# Altium PCB V2.0.pcbdoc
Units mil, origin at the board's own origin, x right, y up, seen from the top; angles counter-clockwise.
Board outline 3149.6 x 1850.4 mil, 2 copper layers (Top Layer, Bottom Layer), stack 62.2 mil thick; 47 components, 71 nets, 213 pads, 302 vias.
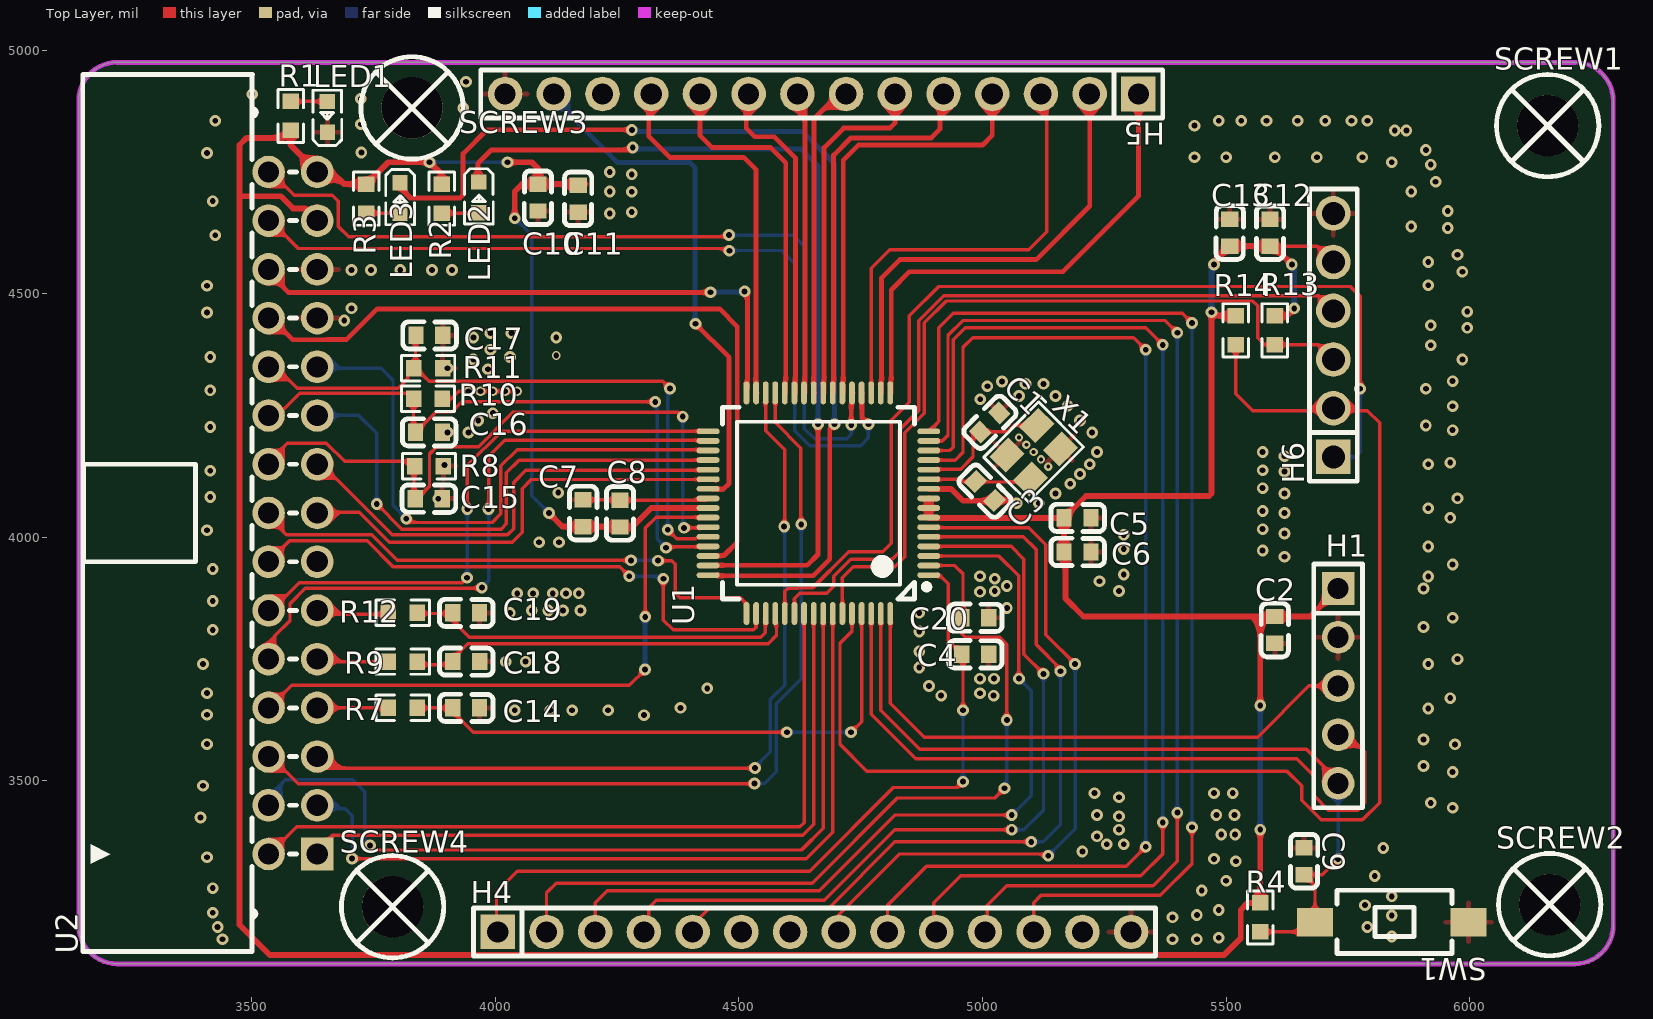
[diagram p0: Top Layer view]
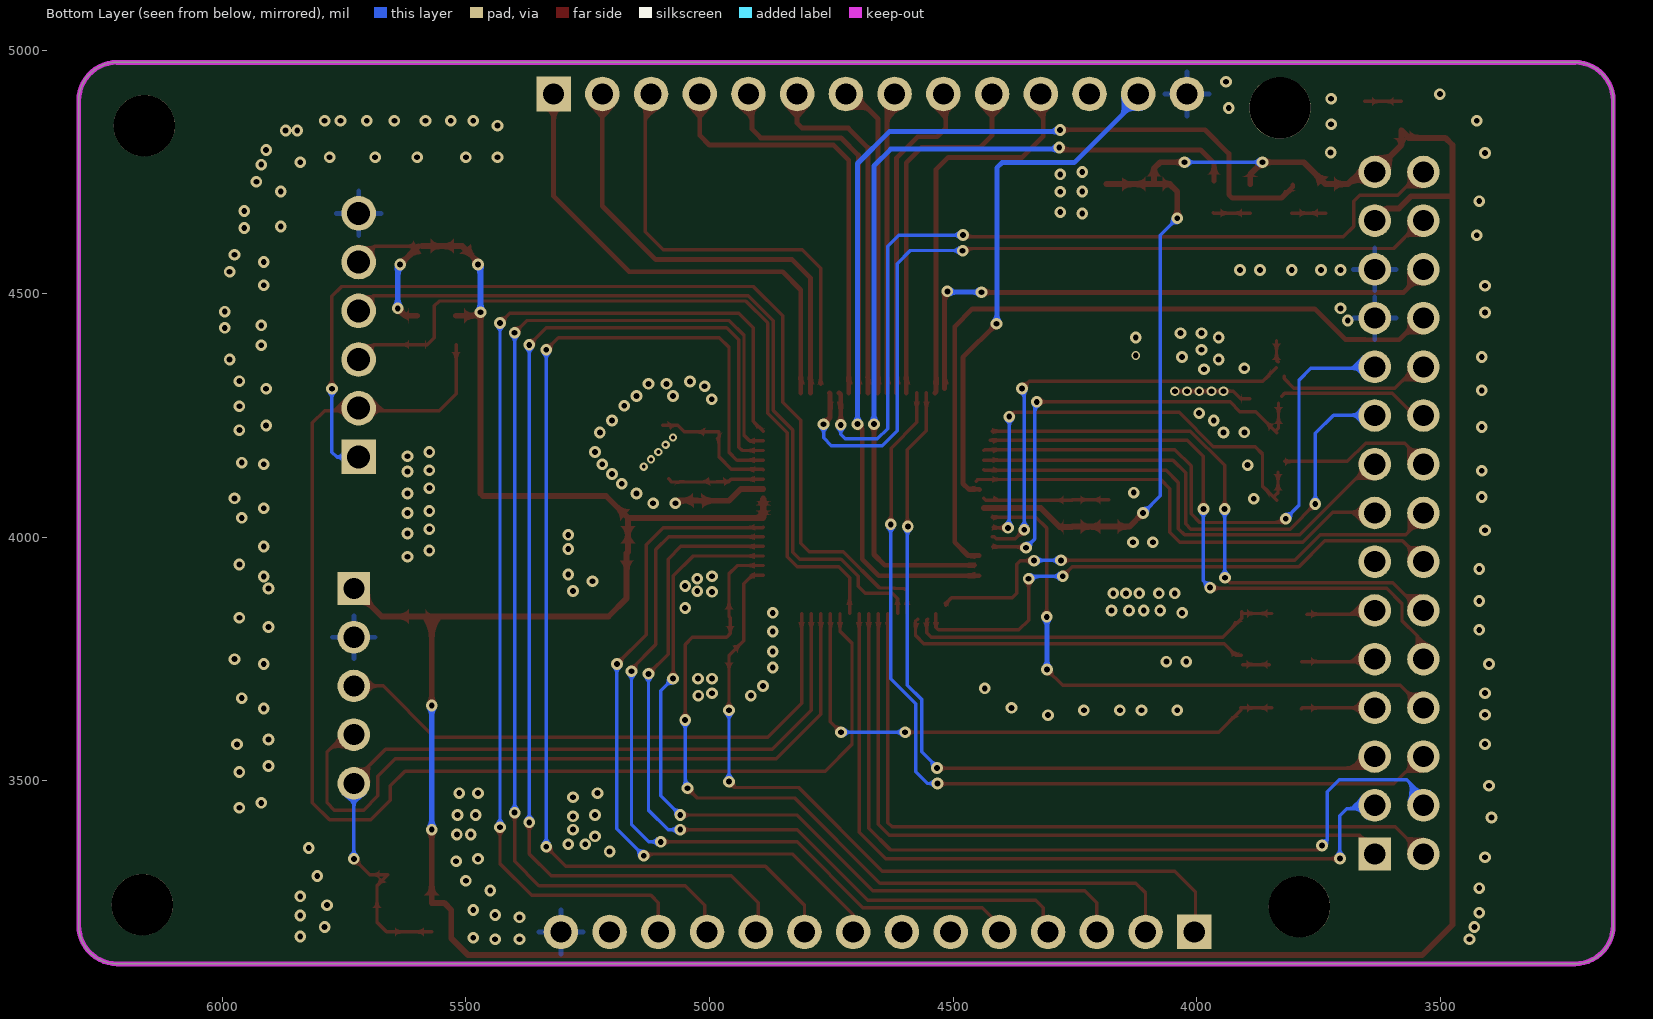
[diagram p1: Bottom Layer view, seen from below]

## Layer stack, top to bottom
Top Solder Mask Layer: solder mask 0.4, Dk 3.3
Top Layer: signal copper 1.4
Dielectric1: surface 59.4, FR4, Dk 4.5
Bottom Layer: signal copper 1.4
Bottom Solder Mask Layer: solder mask 0.4, Dk 3.3

## Board outline
3223.7,4975 ccw(c3223.7,4896.3) 3145,4896.3 3145,3203.3 ccw(c3223.7,3203.3) 3223.7,3124.6 6215.9,3124.6 ccw(c6215.9,3203.3) 6294.6,3203.3 6294.6,4896.3 ccw(c6215.9,4896.3) 6215.9,4975 3223.7,4975

## Design rules (kind name [scope] priority, off if disabled: settings)
BoardOutlineClearance copperThickness1oz [All] p0: genericclearance=10 ignorepadtopadclearanceinfootprint=FALSE except(0: Arc-SplitContinuation Track-SplitContinuation SMDPad-SplitContinuation THPad-SplitContinuation Via-SplitContinuation Fill-SplitContinuation Poly-SplitContinuation Region-SplitContinuation Text-SplitContinuation)
BoardOutlineClearance copperThickness2oz [All] p0: genericclearance=10 ignorepadtopadclearanceinfootprint=FALSE except(0: Arc-SplitContinuation Track-SplitContinuation SMDPad-SplitContinuation THPad-SplitContinuation Via-SplitContinuation Fill-SplitContinuation Poly-SplitContinuation Region-SplitContinuation Text-SplitContinuation)
BoardOutlineClearance otherClearance [All] p0: genericclearance=10 ignorepadtopadclearanceinfootprint=FALSE except(0: Arc-SplitContinuation Track-SplitContinuation SMDPad-SplitContinuation THPad-SplitContinuation Via-SplitContinuation Fill-SplitContinuation Poly-SplitContinuation Region-SplitContinuation Text-SplitContinuation)
Clearance copperThickness1oz [All] p1: gap=7 ignorepadtopadclearanceinfootprint=FALSE
Clearance copperThickness2oz [All] p1: gap=7 ignorepadtopadclearanceinfootprint=FALSE
Clearance otherClearance [All] p1: gap=7 ignorepadtopadclearanceinfootprint=FALSE
DiffPairsRouting differentialPair [All] p1: maxuncoupledlength=10 minlimit=6 maxlimit=Infinity mostfreqgap=6 toplayer_minwidth=5 toplayer_prefwidth=10 toplayer_maxwidth=100 bottomlayer_minwidth=5 bottomlayer_prefwidth=10 bottomlayer_maxwidth=100
PasteMaskExpansion pasteMaskExpansion [All] p1: expansion=0
PlaneConnect innerPlane [All] p1: planeconnectstyle=Relief reliefexpansion=20 reliefentries=4 reliefconductorwidth=10 reliefairgap=10
PolygonConnect copperRegion [All] p1: connectstyle=Relief reliefentries=4 reliefconductorwidth=10 polygonreliefangle="90 Angle" airgapwidth=10
RoutingVias viaSize [All] p1: viastyle="Through Hole" holewidth=12 minholewidth=6 maxholewidth=248.0314 width=12 minwidth=6 maxwidth=248.0314
SolderMaskExpansion solderMaskExpansion [IsVia] p1: useseparateexpansions=TRUE expansion=-1000 expansionbottom=-1000
SolderMaskExpansion solderMaskExpansion [All] p2: useseparateexpansions=TRUE expansion=2 expansionbottom=2
Width copperThickness1oz [All] p1: maxlimit=100 minlimit=5 preferedwidth=7
Width copperThickness2oz [All] p1: maxlimit=100 minlimit=8 preferedwidth=10

## Components (designator, comment, footprint, x,y, rotation, side; value= is the part's Value field where it differs from the comment)
C1 "100nF" C0603#1 5015,4236 r225 top
C2 "100nF" C0603#1 5600,3810 r90 top
C3 "100nF" C0603#1 5005,4095 r135 top
C4 "100nF" C0603#1 4985,3760 r180 top
C5 "100nF" C0603#1 5195,4040 r180 top
C6 "100nF" C0603#1 5195,3970 r180 top
C7 "100nF" C0603#1 4180.2,4049.5 r270 top
C8 "100nF" C0603#2 4255.8,4048.6 r270 top
C9 "100nF" C0603#1 5660,3335 r270 top
C10 "100nF" C0603#3 4087.6,4697.4 r90 top
C11 "100nF" C0603#1 4170,4695 r90 top
C12 "100nF" C0603#1 5590,4625 r270 top
C13 "100nF" C0603#2 5507.4,4625.2 r270 top
C14 "100nF" C0603#1 3940,3650 r180 top
C15 "100nF" C0603#3 3863.4,4079.4 r180 top
C16 "100nF" C0603#1 3863.9,4215.6 r180 top
C17 "100nF" C0603#2 3864.8,4414.6 r180 top
C18 "100nF" C0603#2 3940.1,3745 r180 top
C19 "100nF" C0603#1 3940,3845 r180 top
C20 "100nF" C0603#1 4985,3835 r180 top
H1 "" HDR-TH_5P-P2.54-V-M 5730,3695 r270 top
H4 "" HDR-TH_14P-P2.54-V-M 4655,3190 r0 top
H5 "" HDR-TH_14P-P2.54-V-M 4670,4910 r180 top
H6 "" HDR-TH_6P-P2.54-V-M-1 5720,4415 r90 top
LED1 "" LED_0603 3655,4865 r90 top
LED2 "" LED_0603 3966.2,4695.9 r270 top
LED3 "" LED_0603 3804.7,4694.3 r270 top
R1 "10K" R0603#1 3580,4865 r90 top
R2 "10K" R0603#1 3890,4695 r270 top
R3 "10K" R0603#1 3735,4695 r270 top
R4 "10K" R0603#1 5570,3220 r90 top
R7 "10K" R0603#1 3810,3650 r0 top
R8 "10K" R0603#1 3863.9,4146.1 r180 top
R9 "10K" R0603#1 3810,3745 r0 top
R10 "10K" R0603#2 3861.7,4284.4 r180 top
R11 "10K" R0603#3 3862.3,4347 r180 top
R12 "10K" R0603#1 3810,3845 r0 top
R13 "10K" R0603#1 5600,4425 r90 top
R14 "10K" R0603#1 5520,4425 r90 top
SCREW1 "" M3螺丝 6160,4845 r0 top
SCREW2 "" M3螺丝 6164.1,3246.1 r0 top
SCREW3 "" M3螺丝 3829.1,4881.4 r0 top
SCREW4 "" M3螺丝 3789.1,3241.8 r0 top
SW1 "TS-1101-C-W" SW-SMD_L6.0-W3.3-LS8.0 5840,3210 r180 top
U1 "" LQFP-64_L10.0-W10.0-P0.50-LS12.0-BL-2 4663.2,4070 r90 top
U2 "XDFH-0259-2*15P" CONN-TH_30P-P2.54_LX_XDFH-0259-2X15P 3584.6,4050 r90 top
X1 "8MHz" OSC-SMD_4P-L3.2-W2.5-BL 5105,4175 r225 top

## Footprints (in the part's own frame and the unit in brackets; to place one, negate y for a bottom-side part, rotate by r counter-clockwise, add the part's x,y. Pads: shape width x height; smd on the part's side, far side on the other; paste and mask are expansions set on the pad)
C0603#1 [mil]
  rect 31.5x35.4 smd: 1(-27.58,0) 2(27.58,0)
  silkscreen extent -55,-28 55,28
C0603#2 [mil]
  rect 31.5x35.4 smd: 1(-27.6,0) 2(27.5,0)
  silkscreen extent -55,-28 55,28
C0603#3 [mil]
  rect 31.5x35.4 smd: 1(-27.5,0) 2(27.6,0)
  silkscreen extent -55,-28 55,28
CONN-TH_30P-P2.54_LX_XDFH-0259-2X15P [mil]
  rect 66.9x66.9 hole 43.3: 1(-700,-50)
  round 66.9 hole 43.3: 2(-700,50) 3(-600,-50) 4(-600,50) 5(-500,-50) 6(-500,50) 7(-400,-50) 8(-400,50) 9(-300,-50) 10(-300,50) 11(-200,-50) 12(-200,50) 13(-100,-50) 14(-100,50) 15(0,-50) 16(0,50) 17(100,-50) 18(100,50) 19(200,-50) 20(200,50) 21(300,-50) 22(300,50) 23(400,-50) 24(400,50) 25(500,-50) 26(500,50) 27(600,-50) 28(600,50) 29(700,-50) 30(700,50)
  silkscreen extent -900,-8 900,432
HDR-TH_5P-P2.54-V-M [mil]
  rect 66.9x66.9 hole 43.3: 1(-200,0)
  round 66.9 hole 43.3: 2(-100,0) 3(0,0) 4(100,0) 5(200,0)
  silkscreen extent -250,-50 250,50
HDR-TH_6P-P2.54-V-M-1 [mil]
  rect 70.9x70.9 hole 47.2: 1(-250,0)
  round 70.9 hole 47.2: 2(-150,0) 3(-50,0) 4(50,0) 5(150,0) 6(250,0)
  silkscreen extent -300,-49 300,49
HDR-TH_14P-P2.54-V-M [mil]
  rect 70.9x70.9 hole 43.3: 1(-650,0)
  round 70.9 hole 43.3: 2(-550,0) 3(-450,0) 4(-350,0) 5(-250,0) 6(-150,0) 7(-50,0) 8(50,0) 9(150,0) 10(250,0) 11(350,0) 12(450,0) 13(550,0) 14(650,0)
  silkscreen extent -700,-49 700,49
LED_0603 [mil]
  rect 31.5x31.5 smd paste+0 mask+2: 1(-33.5,-0.4) 2(29.5,-0.2)
  silkscreen extent -61,-30 53,30
LQFP-64_L10.0-W10.0-P0.50-LS12.0-BL-2 [mil]
  oval 11.8x47.2 smd: 1(-147.6,-226.4) 2(-127.9,-226.4) 3(-108.3,-226.4) 4(-88.6,-226.4) 5(-68.9,-226.4) 6(-49.2,-226.4) 7(-29.5,-226.4) 8(-9.8,-226.4) 9(9.8,-226.4) 10(29.5,-226.4) 11(49.2,-226.4) 12(68.9,-226.4) 13(88.6,-226.4) 14(108.3,-226.4) 15(127.9,-226.4) 16(147.6,-226.4) 33(147.6,226.4) 34(127.9,226.4) 35(108.3,226.4) 36(88.6,226.4) 37(68.9,226.4) 38(49.2,226.4) 39(29.5,226.4) 40(9.8,226.4) 41(-9.8,226.4) 42(-29.5,226.4) 43(-49.2,226.4) 44(-68.9,226.4) 45(-88.6,226.4) 46(-108.3,226.4) 47(-127.9,226.4) 48(-147.6,226.4)
  oval 47.2x11.8 smd: 17(226.4,-147.6) 18(226.4,-128) 19(226.4,-108.3) 20(226.4,-88.6) 21(226.4,-68.9) 22(226.4,-49.2) 23(226.4,-29.5) 24(226.4,-9.8) 25(226.4,9.8) 26(226.4,29.5) 27(226.4,49.2) 28(226.4,68.9) 29(226.4,88.6) 30(226.4,108.3) 31(226.4,127.9) 32(226.4,147.6) 49(-226.4,147.6) 50(-226.4,127.9) 51(-226.4,108.3) 52(-226.4,88.6) 53(-226.4,68.9) 54(-226.4,49.2) 55(-226.4,29.5) 56(-226.4,9.8) 57(-226.4,-9.8) 58(-226.4,-29.5) 59(-226.4,-49.2) 60(-226.4,-68.9) 61(-226.4,-88.6) 62(-226.4,-108.3) 63(-226.4,-128) 64(-226.4,-147.6)
  silkscreen extent -197,-228 197,197
M3螺丝 [mil]
  round 126 hole 126 paste+0 mask+4: 1(0,0)
  silkscreen extent -105,-105 105,105
OSC-SMD_4P-L3.2-W2.5-BL [mil]
  rect 55.1x47.2 smd: 1(-43.35,-34.44) 2(43.35,-34.44) 3(43.35,34.44) 4(-43.35,34.44)
  silkscreen extent -90,-75 80,65
R0603#1 [mil]
  rect 31.8x34 smd paste-3937 mask+2: 1(-29.7,0) 2(29.7,0)
  silkscreen extent -54,-26 54,26
R0603#2 [mil]
  rect 31.8x34 smd paste-3937 mask+2: 1(-29.7,0) 2(29.6,0)
  silkscreen extent -54,-26 54,26
R0603#3 [mil]
  rect 31.8x34 smd paste-3937 mask+2: 1(-29.6,0) 2(29.7,0)
  silkscreen extent -54,-26 55,26
SW-SMD_L6.0-W3.3-LS8.0 [mil]
  rect 74.8x59.1 smd: 1(-157.5,0) 2(157.5,0)
  silkscreen extent -124,-66 113,64

## Via types
v1: diameter 24, hole 12, Top Layer to Bottom Layer, 291 vias
v2: diameter 20, hole 12, Top Layer to Bottom Layer, 5 vias
v3: diameter 17, hole 8, Top Layer to Bottom Layer, 5 vias
v4: diameter 18, hole 12, Top Layer to Bottom Layer, 1 vias

## Nets (pads, with @x,y where several pads share a name; then routed paths per layer and width w, separated by ;. In a path a pad name is that pad's centre, name@x,y a point inside that pad or via, vN(x,y) a via of type N, cw(c..) or ccw(c..) an arc to the next point about the centre after c; other vN are vias at no path point)
5V: C2.2 C5.2 C6.2 C7.2 C8.2 C10.2 C11.2 C12.2 C13.2 H1.1 H6.5 R1.1 R2.1 R3.1 R4.2 R13.2 R14.2 U1.7 U1.8 U1.9 U1.41 U2.27 U2.29 | length 8963.8
  Top Layer w7: C12.2 5597.6,4597.4 5687.6,4597.4 H6.5
  Top Layer w12: U2.27 3609.6,4675 3585,4675 3560,4700 3475.1,4700 ; R2.1 3890,4745 v1(3865,4770) 3780.3,4770 R3.1 3734.7,4725 3690,4725 3665,4750 U2.29 3580,4804.6 R1.1 3564.7,4820 3490,4820 3475.1,4805.1 3475.1,4700 ; v1(4025,4770) 4075,4770 4087.6,4757.4 C10.2 ; v1(4040,4655) 4040,4710 4055,4725 C10.2 ; v1(4110,4050) 4138.1,4021.9 C7.2 4255,4021.9 C8.2 4281.1,4021.1 4320.2,4060.2 U1.41 ; C11.2@4185,4725 C10.2 ; U1.9 U1.8 U1.7 4890.2,4039.9 5167.3,4039.9 C5.2 ; v1(5475,4560) 5475,4565.3 C13.2 5589.8,4597.7 C12.2 ; R14.2 5477.4,4454.7 v1(5470,4462) 5470,4090 5465,4085 5212.4,4085 C5.2 ; v1(5570,3400) R4.2 5544.7,3249.7 5530,3235 5530,3177 5495.4,3142.4 3537.6,3142.4 3475.1,3204.9 3475.1,4700 ; v1(5570,3655) 5570,3836.3 5571.3,3837.6 ; C12.2@5597.6,4597.4 v1(5635,4560) ; R13.2 5624.7,4454.7 v1(5640,4470) ; H1.1 5672.6,3837.6 C2.2 5571.3,3837.6 ; C5.2 C6.2 5170,3967.4 5170,3875 5207.4,3837.6 5571.3,3837.6
  Bottom Layer w7: v1(3865,4770) v1(4025,4770) ; v1(4040,4655) 4075,4620 4075,4085 v1(4110,4050)
  Bottom Layer w12: v1(5470,4462) 5470,4555 v1(5475,4560) ; v1(5570,3400) v1(5570,3655) ; v1(5635,4560) 5640,4555 v1(5640,4470)
$1N1119: LED1.2 R1.2 | length 75.3
  Top Layer w7: R1.2 3655,4894.7 LED1.2
$1N2766: H5.12
$1N6410: U2.13
$1N6978: H4.13
$1N6985: H4.6
$1N6986: H4.7
$1N13909: LED2.2 R2.2 | length 76.4
  Top Layer w7: R2.2 3964.8,4665.3 LED2.2@3965.9,4666.4
$1N13949: LED3.2 R3.2 | length 69.7
  Top Layer w7: R3.2 3804,4665.3 LED3.2
CAN_RX: U1.21 U2.30 | length 1760.9
  Top Layer w7: U2.30@3539.4,4749.9 3587.1,4702.3 3665.1,4702.3 3677.6,4689.8 3677.6,4638 3698.8,4616.7 4475.9,4616.7 v1(4479.6,4620.4)
  Top Layer w10: v1(4730.6,4230.9) 4730.6,4293.1 U1.21@4733.9,4296.4
  Bottom Layer w7: v1(4479.6,4620.4) 4611.3,4620.4 4634.3,4597.5 4634.3,4223.2 4655.4,4202.1 4721.1,4202.1 4730.6,4211.5 v1(4730.6,4230.9)
CAN_TX: U1.20 U2.28 | length 1726.1
  Top Layer w7: U2.28@3531.9,4638.1 3550.7,4638.1 3595.8,4592.9 4475.6,4592.9 v1(4480.4,4588.2)
  Top Layer w10: U1.20@4753.6,4296.4 4752.3,4295.1 4752.3,4245.5 v1(4765.8,4232.1)
  Bottom Layer w7: v1(4480.4,4588.2) 4480.9,4588.7 4588,4588.7 4615,4561.7 4615,4219.1 4645.7,4188.4 4749.9,4188.4 4765.8,4204.4 v1(4765.8,4232.1)
CLK: H1.4 U1.62 | length 1506.1
  Top Layer w7: U1.62 4771.5,3636.8 4863,3545.3 5645,3545.3 5680.7,3509.6 5680.7,3469.3 5710,3440 5770,3440 5785,3455 5785,3560 5750,3595 H1.4
DIO: H1.3 U1.64 | length 1175.8
  Top Layer w7: U1.64 4810.8,3659.2 4880,3590 5565,3590 5670,3695 H1.3
EXTAL: C3.2 U1.11 X1.3 | length 198.7
  Top Layer w7: U1.11 4955.8,4119.2 4960.5,4114.5 C3.2 ; C3.2@4985.5,4114.4 5077.2,4113.5 X1.3@5083.7,4120
GND: C1.1 C2.1 C3.1 C4.1 C5.1 C6.1 C7.1 C8.1 C9.1 C10.1 C11.1 C12.1 C13.1 C14.1 C15.1 C16.1 C17.1 C18.1 C19.1 C20.1 H1.2 H4.14 H5.14 H6.6 LED1.1 R8.1 R10.1 R11.1 SW1.1 U1.10 U1.40 U2.23 U2.25 X1.2 X1.4 | length 611.4
  Top Layer w7: R10.1 3909.4,4284.4 3925,4300 v2(3945,4300) v2(3969.8,4300) v2(3994.8,4300) v2(4019.8,4300) v2(4044.8,4300) ; C7.1 4255,4077.1 C8.1 4433.2,4076.2 U1.40
  Top Layer w12: U1.10 4935.5,4099.5 4960,4075 5024,4075 C3.1 5064.5,4075.5 v1(5070,4070)
  other v1: 3440,3175 5390,3175 5439.9,3175 5485,3178 5840,3180.7 3430,3200 5790,3200 5390,3220 5840,3223.6 5439.9,3225 3420,3229.3 5485,3235 5785,3245 5840,3263 5450,3275 3420,3280 5500,3295 5805,3305 5520,3335 5475,3340 3408.1,3343.4 5205,3355 5822.4,3362.4 5255,3370 5290,3370 5235,3386.2 5490,3390 5518.5,3390 5280,3400 3395,3425 5280,3427.3 5235,3430 5480,3430 5517.3,3430 5965,3445 5920,3455 5280,3466.5 5230,3475 5475,3475 5513.7,3475 3400,3490 5965,3518.4 5905,3530.7 5970,3575 3408.1,3575.5 5905,3585 4305,3635 3408.1,3635.9 4040,3645 4113.4,3645 4157.6,3645 4231.5,3645 5915,3648.8 4380,3650 5960,3670 4915,3675 5022.8,3675 3408.1,3680.2 4995,3680 4435,3690 4890,3695 4995,3710 5023.6,3710 4870,3732.8 3400,3740 5915,3740 4021.5,3744.8 4062.3,3744.8 5975,3750 4870,3765.8 4870,3806.8 3420,3810 5905,3816.1 5965,3835 4029.9,3844.9 4870,3845 4075,3850 4108.6,3850 4139.1,3850 4175,3850 5050,3854.8 3420,3869.5 4045,3885 4077.7,3885 4118,3885 4145,3885 4171.1,3885 4995,3888 5025,3889.6 5280,3890 5905,3895 5050,3900 5240,3910 5025,3915 4995,3920 5915,3919.5 5290,3923.6 3420,3935 5965,3944.1 5620,3960 5575,3972.9 5290,3976 5915,3981 4090,3990 4130.7,3990 5290,4005 5620,4008 3408.1,4014.4 5575,4016.8 5960,4040 5620,4049.8 5575,4054.2 5915,4059.7 5115.7,4070 3883,4079.3 5975,4080 3415,4082.9 5150,4090 5620,4090 4129.1,4091.8 5575,4101 5180,4110 5200,4130 5620,4135.2 3415,4136.6 5575,4137.6 3895.4,4148.2 5220,4150 5915,4150 5960,4153.3 5620,4166.4 5235,4175 5575,4175 3945,4215 5225,4215 3902.2,4215.5 5965,4220 3415,4226.5 5910,4229.5 3965,4240 5200,4240 3995,4255 5965,4268.9 5175,4270 4995.4,4283.4 5075,4290 5150,4290 3415,4301.7 5910,4305 5010,4310 5088.4,4315 5125,4315 5040,4320 5965,4320.6 3985,4345 3902.2,4347 3955,4365 5985,4365 3415,4370 4030,4370 3990,4385 5920,4394.4 3955,4410 4125,4410 3990,4419.2 4033.1,4419.2 5995,4430 5920,4435 3690,4445 3408.1,4461.4 5995,4463.3 3705,4470 3408.1,4516.4 5915,4517.4 5985,4545 3705,4548.6 3744.9,4548.6 3804.9,4548.6 3870,4548.6 3911,4548.6 5915,4565 5975,4580 3425,4620 5955,4635 5880,4638 4235,4664.7 4280,4667.5 5955,4670 3420,4690 4280,4709.4 4235,4710 5880,4710 5930,4730 4280,4745 4235,4750 5920,4765 5840,4770 5435,4780 5500,4780 5600,4780 5686.2,4780 5779.7,4780 3408.1,4788.9 3725,4790 5910,4795 5846.1,4835 5870,4835 5435,4845 3724.1,4847.9 3425,4855 5485,4855 5531.2,4855 5582.8,4855 5646.8,4855 5703.4,4855 5757.5,4855 5790,4855 3934.1,4881.4 3724.1,4900.3 3500.8,4909.7 3940,4935
  other v3: 5135,4145 5120,4160 5105,4175 5090,4190 5075,4205
  other v4: 4125,4373.3
HALL1: C14.2 R7.2 U1.61 | length 1155.5
  Top Layer w7: R7.2@3845.7,3649.8 C14.2@3909.9,3649.8 ; C14.2@3909.9,3644.9 3954.9,3600 v1(4598.4,3600) ; v1(4730,3600) 4751.8,3621.8 U1.61
  Bottom Layer w7: v1(4598.4,3600) v1(4730,3600)
HALL2: C18.2 R9.2 U1.52 | length 774.7
  Top Layer w7: R9.2@3851.2,3738.8 C18.2@3905.1,3738.8 ; C18.2@3908.2,3758.2 3919.5,3758.2 3943,3781.7 4559.8,3781.7 4577.2,3799.1 4577.2,3827.8 U1.52@4572.8,3832.1
HALL3: C19.2 R12.2 U1.51 | length 770.3
  Top Layer w7: R12.2@3845.7,3843.7 C19.2@3907.8,3843.7 ; C19.2@3907.8,3847.2 C19.2@3907.8,3843.7 ; U1.51@4552.4,3832.3 4554.1,3830.5 4554.1,3804.4 4544.7,3794.9 3957.8,3794.9 3957.7,3794.9 3946.9,3794.9 3907.8,3834 C19.2@3907.8,3843.7
HU: R7.1 U2.7 | length 146.6
  Top Layer w7: U2.7@3640,3649.8 3783.6,3649.8 R7.1@3785.7,3647.7
HV: R9.1 U2.9 | length 141.5
  Top Layer w7: U2.9@3642.8,3745 R9.1@3784.3,3745
HW: R12.1 U2.11 | length 139
  Top Layer w7: U2.11@3635.2,3842.3 3773.3,3842.3 R12.1@3773.9,3841.6
IBUS: U1.50 U2.14 | length 1174.5
  Top Layer w7: U2.14 3577.6,3992.9 3737.1,3992.9 3790,3940 4255,3940 v1(4275,3920) ; v1(4345,3915) 4345,3830 4365,3810 4530,3810 4535.3,3815.3 U1.50
  Bottom Layer w7: v1(4275,3920) 4340,3920 v1(4345,3915)
IU: U1.42 U2.8 | length 1211.2
  Top Layer w7: U2.8@3540.1,3653.2 3540.1,3654.5 3581.9,3696.3 4275,3696.3 v1(4307.3,3728.6) ; v1(4307.7,3836.7) 4307.7,4019.2 4330.1,4041.6 U1.42@4419.7,4041.6
  Bottom Layer w10: v1(4307.3,3728.6) 4307.3,3836.3 v1(4307.7,3836.7)
IV: U1.34 U2.10 | length 1246.4
  Top Layer w7: U2.10@3547.1,3764 3547.1,3797.6 3578.6,3829.1 3578.6,3864 3610.1,3895.5 3971.1,3895.5 v1(3972.4,3896.8) ; v1(3986.2,4058.2) 3986.2,4166.2 4019.5,4199.5 U1.34@4423.3,4199.5
  Bottom Layer w7: v1(3972.4,3896.8) 3986.2,3910.7 v1(3986.2,4058.2)
IW: U1.33 U2.12 | length 1159.7
  Top Layer w7: U2.12@3545.3,3854.5 3597.9,3907.1 3932,3907.1 v1(3942,3917) ; v1(3942.6,4058) 3942.6,4147.6 4013,4218 U1.33@4419.8,4218
  Bottom Layer w7: v1(3942,3917) 3942.6,3917.7 v1(3942.6,4058)
LED1: LED2.1 U1.47 | length 1776.6
  Top Layer w10: LED2.1@3964.3,4731.1 3964.3,4767.3 3992.2,4795.2 4277.3,4795.2 v1(4282.2,4800) ; U1.47@4456,3942.7 4640.3,3942.7 4662.4,3964.8 v1(4662.4,4232.4)
  Bottom Layer w10: v1(4282.2,4800) 4285.5,4796.7 4628.2,4796.7 4662.4,4762.5 v1(4662.4,4232.4)
LED2: LED3.1 U1.48 | length 2110
  Top Layer w10: LED3.1@3802.8,4723.5 3802.8,4719.2 3825.6,4696.4 3926.9,4696.4 3933.9,4703.5 3933.9,4787.7 3982.9,4836.7 v1@4277,4836.7 ; U1.48@4446.6,3921.2 4652.5,3921.2 4686.4,3955.1 4686.4,4222.5 v1(4696.2,4232.3)
  Bottom Layer w10: v1(4280.3,4836.2) 4283.8,4832.7 4630.8,4832.7 4696.2,4767.4 v1(4696.2,4232.3)
NRST: C9.2 H1.5 R4.1 SW1.2 U1.63 | length 1668.4
  Top Layer w7: U1.63 4791.2,3645 4871.2,3565 5665,3565 5730,3500 H1.5 ; R4.1 5662.9,3190.3 SW1.2 5682.5,3284.9 C9.2 5697.4,3307.4 v1(5730,3340)
  Bottom Layer w7: v1(5730,3340) H1.5
PB3: H5.11 U1.31 | length 796.6
  Top Layer w10: H5.11 4315,4905 4315,4823.1 4358.1,4780 4510,4780 4534.7,4755.3 4534.7,4298.8 U1.31@4537.1,4296.4
PB4: H5.3 U1.19 | length 902.1
  Top Layer w7: U1.19@4772,4314.5 4772,4552 4810,4590 5095,4590 5132.2,4627.2 5132.2,4881.4 H5.3@5118.7,4894.8
PB5: H5.2 U1.18 | length 954.5
  Top Layer w10: U1.18@4792.9,4296.4 4792.9,4532.9 4830,4570 5110,4570 5220,4680 H5.2
PC0: H5.8 U1.26 | length 620
  Top Layer w10: H5.8 4635.5,4894.5 U1.26@4635.5,4296.4
PC1: H5.7 U1.25 | length 650.3
  Top Layer w10: U1.25@4655.2,4296.4 4653.8,4297.8 4653.8,4858.6 4705.2,4910 H5.7
PC16: H5.10 U1.28 | length 756.8
  Top Layer w10: H5.10 4420,4825 4445,4800 4565,4800 4596.1,4768.9 U1.28@4596.1,4296.4
PC17: H5.9 U1.27 | length 680.9
  Top Layer w10: H5.9 4515,4905 4515,4840 4532.9,4822.1 4572.9,4822.1 4615.8,4779.2 U1.27@4615.8,4296.4
PD5: H5.6 U1.24 | length 729.4
  Top Layer w10: U1.24@4674.8,4296.4 4674.8,4799.8 4715,4840 4810,4840 4820,4850 H5.6
PD6: H5.5 U1.23 | length 803.7
  Top Layer w10: U1.23@4694.5,4296.4 4694.5,4784.5 4730,4820 4895,4820 4912.5,4837.5 4912.5,4902.5 H5.5
PD7: H5.4 U1.22 | length 889.6
  Top Layer w10: U1.22@4714.2,4296.4 4714.2,4774.2 4745,4805 5000,4805 5020,4825 H5.4
PD15: H4.11 U1.15 | length 2318
  Top Layer w7: U1.15 4917.9,4197.9 4929.2,4209.2 4929.2,4415 4959.2,4445 5375,4445 v1(5400,4420) ; H4.11@5005,3185 5010,3190 5010,3245 5050,3285 5350,3285 5400,3335 v1(5400,3435)
  Bottom Layer w7: v1(5400,3435) v1(5400,4420)
PD16: H4.10 U1.14 | length 2351.5
  Top Layer w7: U1.14 4933.3,4178.3 4940,4185 4940,4204.4 4940.3,4204.7 4940.3,4405.3 4965,4430 5335,4430 v1(5370,4395) ; H4.10@4905,3185 4900,3190 4900,3250 4955,3305 5325,3305 5370,3350 v1(5370,3415)
  Bottom Layer w7: v1(5370,3415) v1(5370,4395)
PE3: H4.9 U1.13 | length 2345.5
  Top Layer w7: H4.9@4805,3185 4805,3245 4885,3325 5295,3325 v1(5335,3365) ; U1.13 4943.6,4158.6 4960,4175 4960,4390 4980,4410 5310,4410 v1(5335,4385)
  Bottom Layer w7: v1(5335,3365) v1(5335,4385)
PE4: H4.8 U1.6 | length 1464.7
  Top Layer w7: H4.8@4705,3185 4705,3225 4830.1,3350.1 5131.4,3350.1 v1(5135,3346.5) ; U1.6 4890.4,4020 5095,4020 5130,3985 5130,3800 v1(5190,3740)
  Bottom Layer w7: v1(5135,3346.5) 5190,3401.5 v1(5190,3740)
PE5: H4.5 U1.5 | length 1676.8
  Top Layer w7: H4.5@4405,3185 4405,3205 4440,3240 4685,3240 4820,3375 v1(5100,3375) ; U1.5 5083.9,4001.1 5110,3975 5110,3780 5160,3730 v1(5160,3725)
  Bottom Layer w7: v1(5100,3375) 5125,3375 5160,3410 v1(5160,3725)
PE7: H5.13 U1.39 | length 1055.9
  Top Layer w10: v1(4410.7,4438.4) 4479.9,4369.3 4479.9,4110.4 4468,4098.6 4446.7,4098.6 U1.39@4445.9,4097.7
  Bottom Layer w10: H5.13@4126.3,4893.2 4127,4893.2 4251.2,4769 4399.6,4769 4410,4758.6 4410,4439.1 v1(4410.7,4438.4)
PE8: H5.1 U1.17 | length 1008.3
  Top Layer w10: U1.17@4812.6,4296.4 4812.6,4507.6 4850,4545 5165,4545 5320,4700 H5.1
PE9: H4.12 U1.16 | length 2294.7
  Top Layer w7: U1.16 4910,4238.1 4910,4430 4940,4460 5410,4460 v1(5430,4440) ; H4.12@5105,3185 5105,3250 5120,3265 5365,3265 5430,3330 v1(5430,3405)
  Bottom Layer w7: v1(5430,3405) v1(5430,4440)
PE10: H4.4 U1.4 | length 1690.1
  Top Layer w7: H4.4@4305,3185 4315,3195 4315,3240 4330,3255 4675,3255 4820,3400 v1(5060,3400) ; U1.4 5058.6,3981.4 5085,3955 5085,3760 v1(5125.2,3719.8)
  Bottom Layer w7: v1(5060,3400) 5085,3400 5125.2,3440.2 v1(5125.2,3719.8)
PE11: H4.3 U1.3 | length 1714.2
  Top Layer w7: H4.3@4205,3185 4205,3250 4230,3275 4665,3275 4820,3430 v1(5060,3430) ; U1.3 5033.3,3961.7 5074,3921 5074,3711 v1(5075,3710)
  Bottom Layer w7: v1(5060,3430) 5100,3470 5100,3685 v1(5075,3710)
PU: C15.2 R8.2 U1.43 U2.18 | length 1282.2
  Top Layer w7: U2.18@3541.7,4162.2 3573,4193.4 3653.2,4193.4 3690.8,4155.8 R8.2@3819.2,4155.8 ; R8.2@3833.1,4134 3833.1,4091.8 C15.2@3838.8,4086.2 ; C15.2@3836,4075.9 3864.9,4104.8 3864.9,4171.1 3880.1,4186.3 3965.7,4186.3 4036,4256.6 4375.9,4256.6 v1(4384.6,4247.8) ; v1(4387.4,4019.5) 4416.6,4019.5 U1.43@4417.6,4020.5
  Bottom Layer w7: v1(4384.6,4247.8) 4384.6,4022.3 v1(4387.4,4019.5)
PV: C16.2 R10.2 U1.45 U2.20 | length 1243.6
  Top Layer w7: U2.20@3554.5,4263.5 3567,4263.5 3598.9,4295.4 3819.7,4295.4 R10.2@3825.2,4289.8 ; R10.2@3832,4275.5 3832,4225.1 C16.2@3839.1,4218 ; C16.2@3835.6,4214.4 C16.2@3839.1,4218 ; v1(4328.4,4278.1) 3931.3,4278.1 3911.2,4257.9 3879.1,4257.9 C16.2@3839.1,4218 ; v1(4350.4,3978.5) 4352.5,3980.5 U1.45@4418.6,3980.5
  Bottom Layer w7: v1(4328.4,4278.1) 4332.3,4274.1 4332.3,3996.6 v1(4350.4,3978.5)
PW: C17.2 R11.2 U1.44 U2.22 | length 1246.8
  Top Layer w7: U2.22@3554.9,4345.2 3593.7,4306.4 3800.7,4306.4 3820.3,4326 R11.2@3820.3,4331.2 ; R11.2@3832,4359.8 3836.1,4364 C17.2@3836.1,4403.9 ; R11.2@3836.6,4347.9 3864.4,4320.1 4344,4320.1 v1(4358.5,4305.6) ; v1(4353.8,4015.5) 4372.5,3996.8 4411.7,3996.8 4415.9,4000.9 U1.44@4419.2,4000.9
  Bottom Layer w7: v1(4353.8,4015.5) 4353.8,4300.9 v1(4358.5,4305.6)
SPI_CS: H6.1 U1.53 | length 2124.8
  Top Layer w7: U1.53 4594.3,3889.3 4600,3895 4619.4,3895 4620.4,3896 4651,3896 4725,3970 4795,3970 4812.5,3987.5 4812.5,4240 4849.9,4277.4 4849.9,4455 4909.8,4514.8 5755.2,4514.8 5775,4495 v1(5775,4305)
  Bottom Layer w7: H6.1 5765,4165 5775,4175 v1(5775,4305)
SPI_SCK: H6.2 R14.1 U1.60 | length 2686.9
  Top Layer w7: U1.60 4732.1,3807.1 4707.5,3782.5 4707.5,3575 4762.5,3520 5625,3520 5655,3490 5655,3460 5695,3420 5780,3420 5815,3455 5815,4235 5790,4260 5725,4260 H6.2 5715,4260 5555,4260 5520,4295 R14.1
SPI_SIN: H6.3 R13.1 U1.59 | length 1662
  Top Layer w7: U1.59 4712.4,3917.4 4735,3940 4820,3940 4840,3960 4840,4215 4880,4255 4880,4440 4925,4485 5555,4485 5565,4475 5565,4410 5579.7,4395.3 R13.1 5689.7,4395.3 H6.3
SPI_SOUT: H6.4 U1.54 | length 1674
  Top Layer w7: U1.54 4614,3874 4625,3885 4680,3885 4695,3900 4695,3920 4730,3955 4815,3955 4829,3969 4829,4220.3 4869,4260.3 4869,4445 4920,4496 5689,4496 H6.4
SPIN: U1.46 U2.24 | length 1521.4
  Top Layer w10: U2.24@3539.4,4450.6 3584.4,4405.6 3653.4,4405.6 3654.1,4406.3 3695.1,4406.3 3757.7,4468.9 4460.4,4468.9 4496.7,4432.6 4496.7,3990 4469.4,3962.7 4446.7,3962.7 U1.46@4446.5,3962.9
START: U1.38 U2.15 | length 941.9
  Top Layer w7: U2.15@3644.1,4051.9 3720.6,4051.9 3782.5,3990 4035,3990 4055,4010 4055,4100 4073.7,4118.7 4449,4118.7 U1.38@4452.8,4114.9
STOP: U1.37 U2.17 | length 953.7
  Top Layer w7: U2.17@3649.6,4138.8 3651.1,4137.3 3656.1,4137.3 3788.4,4005 4025,4005 4037.6,4017.6 4037.6,4112.6 4062.3,4137.3 4435.2,4137.3 U1.37
TEMP: U1.32 U2.26 | length 1203
  Top Layer w10: U2.26@3530.4,4548 3530.4,4547.6 3575.2,4502.8 4441,4502.8 v1(4441.5,4503.2) ; v1(4511.7,4504.9) 4517.6,4499 U1.32@4517.6,4305.4
  Bottom Layer w10: v1(4441.5,4503.2) 4510,4503.2 v1(4511.7,4504.9)
UART_RX: U1.35 U2.21 | length 1195.3
  Top Layer w7: v1(3817.1,4038.3) v1@3817.8,4037.5 ; v1@3818.6,4037.5 v1@3817.8,4037.5 ; U1.35 4435.2,4179.9 4044.9,4179.9 4011.5,4146.5 4011.5,4048.5 3993.5,4030.5 3824.8,4030.5 v1@3817.8,4037.5
  Bottom Layer w7: U2.21@3643.9,4346.9 3765.6,4346.9 3790,4322.5 3790,4065.4 v1(3817.1,4038.3)
UART_TX: U1.36 U2.19 | length 1088.9
  Top Layer w7: v1(3756.5,4068.5) 3808.2,4016.8 4011.8,4016.8 4022.5,4027.5 4022.5,4132.5 4048.6,4158.6 U1.36
  Bottom Layer w7: U2.19@3650,4250.8 3719.2,4250.8 3756.5,4213.5 v1(3756.5,4068.5)
UN: U1.55 U2.2 | length 1530.9
  Top Layer w7: U2.2@3552.3,3365.5 3592.4,3405.6 4624.9,3405.6 4633.7,3414.4 U1.55
UP: U1.56 U2.1 | length 1462.4
  Top Layer w7: U2.1@3642.3,3365.6 3665.5,3388.8 4631.1,3388.8 4653.4,3411.1 U1.56
VBUS: U1.49 U2.16 | length 1082.6
  Top Layer w7: U2.16@3541.3,4034.5 3570.7,4005.1 3746.5,4005.1 3798.8,3952.8 v1(4278.5,3952.8) ; v1(4333.9,3952.1) 4362.2,3952.1 4369.2,3945.1 4369.2,3885.3 4378.6,3875.9 4503.3,3875.9 4515.2,3864 U1.49@4515.2,3861
  Bottom Layer w7: v1(4278.5,3952.8) 4333.2,3952.8 v1(4333.9,3952.1)
VDD15: C4.2 H4.1 U1.1 | length 1606.2
  Top Layer w7: H4.1@4005,3185 4002.5,3187.5 4002.5,3272.5 4045,3315 4645,3315 4816.5,3486.5 4948,3486.5 v1(4960,3498.5) ; U1.1 4912.6,3922.4 4929.9,3905.1 4929.9,3787.5 C4.2 4960,3757.4 v1(4960,3645)
  Bottom Layer w7: v1(4960,3498.5) v1(4960,3645)
VDD25: C20.2 H4.2 U1.2 | length 1714
  Top Layer w7: H4.2@4105,3185 4105,3270 4125.1,3290.1 4650.1,3290.1 4825,3465 5025,3465 v1(5045,3485) ; U1.2 4942.9,3942.1 4960,3925 4960,3837.6 C20.2 4957.4,3802.6 4965,3795 5035,3795 5050,3780 v1(5050,3625)
  Bottom Layer w7: v1(5045,3485) 5050,3490 v1(5050,3625)
VN: U1.57 U2.4 | length 1729.4
  Top Layer w7: v1(3742.8,3367.3) 3751.8,3358.2 4628.4,3358.2 4673,3402.9 U1.57
  Bottom Layer w7: U2.4@3538.1,3467.1 3538.1,3471.4 3568.9,3502.3 3707.5,3502.3 3732.2,3477.6 3732.2,3377.9 v1(3742.8,3367.3)
VP: U1.58 U2.3 | length 1604.5
  Top Layer w7: v1@3707.2,3340.5 3707.3,3340.4 4638.4,3340.4 4692.7,3394.8 U1.58
  Bottom Layer w7: U2.3@3651.3,3444 3652.4,3443 3692.2,3443 3706.5,3428.8 v1@3706.5,3342.6
  other v1: 3705.7,3340.8
WN: U1.29 U2.6 | length 1887.4
  Top Layer w7: U2.6@3544.5,3544.8 3595.3,3494 4531.3,3494 v1(4532.1,3494.8) ; U1.29 4574.6,4235.8 4627.3,4183.2 v1@4627.3,4023.6
  Bottom Layer w7: v1(4532.1,3494.8) 4552.9,3494.8 4576.9,3518.8 4576.9,3658.5 4628.1,3709.7 v1(4628.1,4026.6)
WP: U1.30 U2.5 | length 1719.9
  Top Layer w7: U2.5@3635.2,3547.5 3656.4,3526.4 v1(4532.9,3526.4) ; U1.30 4554.9,4219.1 4594.3,4179.8 4594.3,4023.8 v1(4592.8,4022.3)
  Bottom Layer w7: v1(4532.9,3526.4) 4532.9,3527.9 4564.6,3559.6 4564.6,3667.1 ; 4564.4,3666.9 4564.6,3667.1 ; 4564.6,3667.7 4564.6,3667.1 ; v1(4592.8,4022.3) 4593.8,4021.3 4593.8,3696.2 4564.6,3667.1
XTAL: C1.2 U1.12 X1.1 | length 274.3
  Top Layer w7: U1.12 4890.7,4140 4955,4140 4980.5,4165.5 4980.5,4216.5 5051.5,4216.5 5065,4230 X1.1@5096.3,4230
pads on no net: SCREW1.1 SCREW2.1 SCREW3.1 SCREW4.1

## Polygon pours and split planes (outlines as drawn)
GND on Top Layer (solid, remove dead copper, pour order 0): 3065,5035 3065,3000 6365,3000 6365,5035
GND on Bottom Layer (solid, remove dead copper, pour order 4): 3000,4975 3000,3015 6375,3015 6375,4975

## Keep-outs
Board Outline Layer:
  lines w10: 3145,3203.3 3145,4896.3 cw(c3223.7,4896.3) 3223.7,4975 6215.9,4975 cw(c6215.9,4896.3) 6294.6,4896.3 6294.6,3203.3 cw(c6215.9,3203.3) 6215.9,3124.6 3223.7,3124.6 cw(c3223.7,3203.3) 3145,3203.3 ; 3145,3203.3 3145,3203.3

## Other copper
Top Layer:
  drawing of 268 lines, arcs and shapes, not listed
Bottom Layer:
  region net NRST: 5733.5,3449.4 5726.5,3449.4 5726.3,3451.2 5725.7,3452.9 5724.9,3454.7 5723.7,3456.4 5722.3,3458.1 5720.8,3459.7 5717.3,3462.9 5713.6,3465.8 5710.1,3468.5 5707,3470.9 5704.9,3472.9 5755.1,3472.9 5753,3470.9 5749.9,3468.5 5746.4,3465.8 5742.7,3462.9 5739.2,3459.7 5737.7,3458.1 5736.3,3456.4 5735.1,3454.7 5734.3,3452.9 5733.7,3451.2
  region net PE7: 4156.1,4871.1 4141.7,4871.4 4140.2,4872.6 4138.6,4873.6 4136.7,4874.3 4134.7,4874.9 4132.6,4875.2 4130.4,4875.5 4125.9,4875.6 4117.2,4875.4 4113.6,4875.4 4112.1,4875.5 4110.9,4875.8 4155.1,4905.2 4154.5,4899.7 4154.1,4894.1 4153.9,4888.7 4153.9,4883.7 4154.2,4879.2 4154.6,4875.5 4155.3,4872.7 4155.7,4871.8
  region net SPI_CS: 5765,4168.5 5765,4161.5 5762.2,4161.1 5759.5,4160.1 5757.2,4158.4 5755.4,4156.3 5755.4,4173.8 5757.2,4171.6 5759.5,4169.9 5762.2,4168.9
  region net VP: 3684.9,3446.5 3674.4,3439.5 3672.7,3439.3 3671,3438.8 3669.2,3438 3667.6,3437 3665.9,3435.8 3664.3,3434.4 3661.2,3431.3 3655.6,3425 3653.1,3422.5 3652,3421.5 3651,3420.8 3661.5,3469.9 3664.9,3465.5 3668.4,3461.3 3671.9,3457.4 3675.3,3453.8 3678.5,3450.8 3681.2,3448.5 3683.4,3447 3684.3,3446.6
  region net VN: 3547.5,3485.8 3565.9,3494.3 3565.2,3493.4 3564.6,3492.2 3564.1,3490.7 3563.6,3489.1 3563.1,3485.2 3563,3480.7 3563.2,3475.8 3563.9,3470.7 3564.9,3465.6 3566.3,3460.7 3520,3480.1 3521.1,3480.5 3522.4,3480.8 3525.5,3481.1 3533.2,3481.4 3537.2,3481.7 3541.1,3482.4 3542.9,3483 3544.6,3483.7 3546.2,3484.6
  region net UART_TX: 3679.6,4254.3 3680.8,4247.3 3679,4247.1 3677.3,4246.6 3675.6,4245.7 3673.9,4244.5 3672.2,4243.1 3670.5,4241.6 3667.3,4238 3664.4,4234.3 3661.7,4230.7 3659.3,4227.7 3657.4,4225.5 3656.1,4275.6 3658.1,4273.6 3660.5,4270.6 3663.2,4267.1 3666.1,4263.5 3669.3,4260 3670.9,4258.5 3672.6,4257.1 3674.3,4256 3676.1,4255.1 3677.8,4254.5
  region net UART_RX: 3682.4,4350.4 3677.7,4343.4 3676,4343.2 3674.2,4342.6 3672.5,4341.8 3670.8,4340.7 3669.2,4339.4 3667.5,4337.9 3664.4,4334.5 3658.8,4327.7 3656.4,4324.9 3654.3,4322.9 3659,4372.9 3667,4364.6 3674.3,4357.4 3679.8,4352.3 3681.5,4350.9
  region net CAN_RX: 4734.1,4214.6 4727.1,4214.6 4726.6,4215.9 4725.4,4218 4723.6,4220.5 4721.6,4223 4739.6,4223 4737.6,4220.5 4735.8,4218 4734.6,4215.9
  region net CAN_TX: 4769.3,4215.7 4762.3,4215.7 4761.9,4217.1 4760.6,4219.2 4758.9,4221.7 4756.8,4224.1 4774.8,4224.1 4772.8,4221.7 4771.1,4219.2 4769.8,4217.1
  region net TEMP: 4496.7,4498.2 4494.1,4508.2 4495.1,4508.3 4496.1,4508.6 4498.5,4509.6 4500.7,4511.1 4502.5,4512.7 4505.1,4494.9 4502.9,4496.1 4500.6,4497.2 4498.4,4497.9
  region net TEMP: 4457.8,4508.2 4457.8,4498.2 4456,4497.9 4453.7,4497 4451.4,4495.7 4449.4,4494.2 4449.4,4512.2 4451.4,4510.8 4453.7,4509.5 4456,4508.6
  region net IU: 4312.3,3820 4302.3,3820.6 4302,3822.4 4301.1,3824.7 4299.9,3827 4298.5,3829 4316.5,3828.4 4314.9,3826.5 4313.6,3824.2 4312.7,3821.9
  region net IU: 4302.3,3745 4312.3,3745 4312.7,3743.2 4313.6,3740.9 4314.9,3738.6 4316.3,3736.6 4298.3,3736.6 4299.8,3738.6 4301.1,3740.9 4302,3743.2
  region net LED1: 4657.4,4248.8 4667.4,4248.8 4667.7,4247 4668.6,4244.7 4669.9,4242.4 4671.4,4240.4 4653.4,4240.4 4654.8,4242.4 4656.1,4244.7 4657,4247
  region net LED1: 4300.7,4801.7 4295.7,4791.7 4294.1,4791.4 4291.9,4790.9 4289.5,4790.1 4287.3,4789.2 4292.3,4806.4 4293,4805.5 4293.9,4804.7 4296,4803.2 4298.5,4802.1 4299.6,4801.8
  region net LED2: 4691.2,4248.6 4701.2,4248.6 4701.5,4246.8 4702.4,4244.6 4703.7,4242.2 4705.2,4240.2 4687.2,4240.2 4688.7,4242.2 4689.9,4244.6 4690.8,4246.8
  region net LED2: 4298.9,4837.7 4293.7,4827.7 4292.2,4827.5 4290,4827 4287.6,4826.2 4285.3,4825.3 4290.5,4842.5 4291.2,4841.6 4292.1,4840.8 4294.3,4839.2 4296.7,4838.1 4297.8,4837.8
  region net PE7: 4405,4454.1 4415,4455.3 4415.4,4453.4 4416.3,4451.1 4417.7,4448.8 4419.2,4446.9 4401.3,4445.7 4402.6,4447.8 4403.8,4450.2 4404.7,4452.4
  region net PW: 4357.3,4286.4 4350.3,4293.5 4350.2,4294.8 4349.9,4296 4348.9,4298.3 4347.8,4300.3 4347.1,4301.9 4363.6,4294.8 4362.5,4294.1 4361.3,4293.2 4360.2,4292.2 4359.3,4291 4358.5,4289.8 4357.8,4288.6 4357.4,4287.5
  region net PW: 4350.3,4031.9 4357.3,4031.9 4357.7,4030.5 4359,4028.4 4360.8,4025.9 4362.8,4023.5 4344.8,4023.5 4346.8,4025.9 4348.6,4028.4 4349.8,4030.5
  region net PV: 4335.8,4265.1 4328.8,4259.2 4328.7,4260.2 4328.2,4261.3 4327.6,4262.5 4326.8,4263.7 4324.8,4265.9 4323.6,4266.8 4322.5,4267.6 4339.5,4273.5 4338.6,4272 4337.4,4270 4336.3,4267.6 4335.9,4266.4
  region net PV: 4336.4,3987.6 4341.3,3992.5 4342.6,3991.9 4345,3991.3 4348,3990.8 4351.2,3990.5 4338.4,3977.7 4338.1,3980.9 4337.6,3983.9 4337,3986.3
  region net PU: 4388.1,4231.5 4381.1,4231.5 4380.7,4232.8 4379.4,4234.9 4377.7,4237.4 4375.6,4239.9 4393.6,4239.9 4391.6,4237.4 4389.9,4234.9 4388.6,4232.8
  region net PU: 4381.1,4033.5 4388.1,4037.7 4388.3,4036.8 4388.7,4035.8 4390.1,4033.6 4392.1,4031.2 4394.3,4029.3 4376.8,4025.1
  region net CAN_RX: 4496,4623.9 4496,4616.9 4494.7,4616.5 4492.5,4615.2 4490.1,4613.5 4487.6,4611.4 4487.6,4629.4 4490.1,4627.4 4492.5,4625.7 4494.7,4624.4
  region net CAN_TX: 4496.3,4592.2 4497.1,4585.2 4496.5,4585.1 4495.7,4584.7 4493.5,4583.5 4491.1,4581.6 4488.7,4579.6 4487.9,4597.5 4490.5,4595.6 4493,4593.9 4495.1,4592.7
  region net HALL1: 4614.7,3603.5 4614.7,3596.5 4613.4,3596 4611.3,3594.8 4608.8,3593 4606.3,3591 4606.3,3609 4608.8,3607 4611.3,3605.2 4613.4,3604
  region net VP: 3703,3357.7 3710,3356.5 3710.4,3355.3 3711.6,3353.3 3713.3,3350.7 3715.2,3348.1 3697.2,3349.3 3699.3,3351.6 3701.2,3354 3702.5,3356.2 3702.8,3357
  region net VN: 3729.7,3375.4 3734.6,3380.4 3735.6,3380.1 3737.7,3379.8 3743.5,3379.3 3730.8,3366.5 3730.3,3372.4 3730,3374.5
  region net WP: 4597.3,4006.7 4590.3,4005.3 4590.1,4005.9 4589.8,4006.8 4588.5,4008.9 4586.6,4011.4 4584.5,4013.7 4602.4,4015.1 4598.9,4009.9 4597.7,4007.9
  region net WP: 4540.7,3540.6 4546.7,3536.7 4546.3,3536.2 4546,3535.3 4545.4,3532.8 4545,3529.8 4544.9,3526.7 4531.1,3538.3 4537.3,3539.5 4539.5,3540.1
  region net WN: 4631.6,4010.3 4624.6,4010.3 4624.1,4011.6 4622.9,4013.7 4621.1,4016.2 4619.1,4018.7 4637.1,4018.7 4635.1,4016.2 4633.3,4013.7 4632,4011.6
  region net WN: 4548.4,3498.3 4548.4,3491.3 4547.1,3490.8 4545,3489.6 4542.5,3487.8 4540,3485.8 4540,3503.8 4542.5,3501.8 4545,3500 4547.1,3498.8
  region net UART_RX: 3803.1,4047.3 3808,4052.3 3809.3,4051.7 3811.7,4051.1 3814.7,4050.6 3817.9,4050.2 3805.1,4037.5 3804.8,4040.7 3804.3,4043.7 3803.7,4046.1
  region net UART_TX: 3753,4084.8 3760,4084.8 3760.5,4083.5 3761.7,4081.4 3763.5,4078.9 3765.5,4076.4 3747.5,4076.4 3749.5,4078.9 3751.3,4081.4 3752.5,4083.5
  region net IW: 3946.1,4041.7 3939.1,4041.7 3938.7,4043 3937.4,4045.1 3935.6,4047.6 3933.6,4050.1 3951.6,4050.1 3949.6,4047.6 3947.8,4045.1 3946.6,4043
  region net IW: 3939.1,3933.8 3946.1,3932.9 3946.6,3931.7 3947.8,3929.6 3949.5,3927.1 3951.4,3924.5 3933.4,3925.4 3935.5,3927.8 3937.3,3930.2 3938.6,3932.4 3939,3933.2
  region net IV: 3989.7,4041.9 3982.7,4041.9 3982.3,4043.2 3981,4045.3 3979.2,4047.8 3977.2,4050.3 3995.2,4050.3 3993.2,4047.8 3991.4,4045.3 3990.2,4043.2
  region net IV: 3981.5,3910.9 3986.5,3905.9 3985.8,3904.6 3985.2,3902.3 3984.7,3899.3 3984.4,3896.1 3971.7,3908.8 3974.9,3909.1 3977.9,3909.7 3980.2,3910.3
  region net VBUS: 4294.8,3956.3 4294.8,3949.3 4293.5,3948.8 4291.4,3947.5 4288.9,3945.8 4286.4,3943.8 4286.4,3961.8 4288.9,3959.7 4291.4,3958 4293.5,3956.7
  region net VBUS: 4317.1,3949.3 4318.1,3956.3 4319.3,3956.7 4321.3,3957.9 4323.9,3959.6 4326.5,3961.5 4325.5,3943.5 4323.1,3945.6 4320.7,3947.5 4318.5,3948.8 4317.7,3949.1
  region net IBUS: 4291.3,3923.5 4291.3,3916.5 4290,3916 4287.9,3914.8 4285.4,3913 4282.9,3911 4282.9,3929 4285.4,3927 4287.9,3925.2 4290,3924
  region net IBUS: 4325.6,3916.5 4333.1,3923.5 4334.4,3923.6 4335.6,3923.9 4338,3924.8 4340,3925.8 4341.5,3926.5 4334,3910.1 4333.4,3911.3 4332.5,3912.5 4331.5,3913.5 4330.3,3914.5 4329.1,3915.3 4327.9,3916 4326.7,3916.4
  region net PD15: 5403.5,4403.7 5396.5,4403.7 5396,4405 5394.8,4407.1 5393,4409.6 5391,4412.1 5409,4412.1 5407,4409.6 5405.2,4407.1 5404,4405
  region net PD15: 5396.5,3451.3 5403.5,3451.3 5404,3450 5405.2,3447.9 5407,3445.4 5409,3442.9 5391,3442.9 5393,3445.4 5394.8,3447.9 5396,3450
  region net PE9: 5433.5,4423.7 5426.5,4423.7 5426,4425 5424.8,4427.1 5423,4429.6 5421,4432.1 5439,4432.1 5437,4429.6 5435.2,4427.1 5434,4425
  region net PE9: 5426.5,3421.3 5433.5,3421.3 5434,3420 5435.2,3417.9 5437,3415.4 5439,3412.9 5421,3412.9 5423,3415.4 5424.8,3417.9 5426,3420
  region net PD16: 5373.5,4378.7 5366.5,4378.7 5366,4380 5364.8,4382.1 5363,4384.6 5361,4387.1 5379,4387.1 5377,4384.6 5375.2,4382.1 5374,4380
  region net PD16: 5366.5,3431.3 5373.5,3431.3 5374,3430 5375.2,3427.9 5377,3425.4 5379,3422.9 5361,3422.9 5363,3425.4 5364.8,3427.9 5366,3430
  region net PE3: 5338.5,4368.7 5331.5,4368.7 5331,4370 5329.8,4372.1 5328,4374.6 5326,4377.1 5344,4377.1 5342,4374.6 5340.2,4372.1 5339,4370
  region net PE3: 5331.5,3381.3 5338.5,3381.3 5339,3380 5340.2,3377.9 5342,3375.4 5344,3372.9 5326,3372.9 5328,3375.4 5329.8,3377.9 5331,3380
  region net PE4: 5193.5,3723.7 5186.5,3723.7 5186,3725 5184.8,3727.1 5183,3729.6 5181,3732.1 5199,3732.1 5197,3729.6 5195.2,3727.1 5194,3725
  region net PE4: 5144.1,3360.5 5149,3355.6 5148.4,3354.3 5147.8,3351.9 5147.3,3348.9 5147,3345.7 5134.2,3358.5 5137.4,3358.8 5140.4,3359.3 5142.8,3359.9
  region net PE5: 5163.5,3708.7 5156.5,3708.7 5156,3710 5154.8,3712.1 5153,3714.6 5151,3717.1 5169,3717.1 5167,3714.6 5165.2,3712.1 5164,3710
  region net PE5: 5116.3,3378.5 5116.3,3371.5 5115,3371 5112.9,3369.8 5110.4,3368 5107.9,3366 5107.9,3384 5110.4,3382 5112.9,3380.2 5115,3379
  region net PE10: 5128.7,3703.5 5121.7,3703.5 5121.2,3704.8 5120,3706.9 5118.2,3709.4 5116.2,3711.9 5134.2,3711.9 5132.2,3709.4 5130.4,3706.9 5129.2,3704.8
  region net PE10: 5076.3,3403.5 5076.3,3396.5 5075,3396 5072.9,3394.8 5070.4,3393 5067.9,3391 5067.9,3409 5070.4,3407 5072.9,3405.2 5075,3404
  region net PE11: 5089,3700.9 5084.1,3696 5082.8,3696.6 5080.4,3697.2 5077.4,3697.7 5074.2,3698 5087,3710.8 5087.3,3707.6 5087.8,3704.6 5088.4,3702.2
  region net PE11: 5069.1,3444 5074,3439.1 5073.4,3437.8 5072.8,3435.4 5072.3,3432.4 5072,3429.2 5059.2,3442 5062.4,3442.3 5065.4,3442.8 5067.8,3443.4
  region net HALL1: 4713.7,3596.5 4713.7,3603.5 4715,3604 4717.1,3605.2 4719.6,3607 4722.1,3609 4722.1,3591 4719.6,3593 4717.1,3594.8 4715,3596
  region net SPI_CS: 5778.5,4288.7 5771.5,4288.7 5771,4290 5769.8,4292.1 5768,4294.6 5766,4297.1 5784,4297.1 5782,4294.6 5780.2,4292.1 5779,4290
  region net VDD15: 4963.5,3628.7 4956.5,3628.7 4956,3630 4954.8,3632.1 4953,3634.6 4951,3637.1 4969,3637.1 4967,3634.6 4965.2,3632.1 4964,3630
  region net VDD25: 5053.5,3608.7 5046.5,3608.7 5046,3610 5044.8,3612.1 5043,3614.6 5041,3617.1 5059,3617.1 5057,3614.6 5055.2,3612.1 5054,3610
  region net VDD25: 5046.5,3504.4 5053.5,3496.9 5053.6,3495.6 5053.9,3494.4 5054.8,3492 5055.8,3490 5056.5,3488.5 5040.1,3496 5041.3,3496.6 5042.5,3497.5 5043.5,3498.5 5044.5,3499.7 5045.3,3500.9 5046,3502.1 5046.4,3503.3
  region net VDD15: 4956.5,3514.9 4963.5,3514.9 4964,3513.5 4965.2,3511.4 4967,3508.9 4969,3506.5 4951,3506.5 4953,3508.9 4954.8,3511.4 4956,3513.5
  region net NRST: 5726.5,3356.3 5733.5,3356.3 5734,3355 5735.2,3352.9 5737,3350.4 5739,3347.9 5721,3347.9 5723,3350.4 5724.8,3352.9 5726,3355
  region net 5V: 5464,4478.4 5476,4478.4 5476.3,4476.2 5476.9,4473.9 5477.9,4471.6 5479,4470 5461,4470 5462.1,4471.6 5463.1,4473.9 5463.7,4476.2
  region net 5V: 5476,4540.3 5464,4548.1 5463.8,4553.3 5463.5,4556.5 5479,4548.7 5478.4,4548.3 5477.9,4547.7 5476.9,4545.7 5476.3,4543.1
  region net 5V: 5634,4486.3 5646,4486.3 5646.3,4484.2 5646.9,4481.8 5647.9,4479.6 5649,4477.9 5631,4477.9 5632.1,4479.6 5633.1,4481.8 5633.7,4484.2
  region net 5V: 5646,4548.1 5634,4540.3 5633.7,4543.1 5633.1,4545.7 5632.1,4547.7 5631.6,4548.3 5631,4548.7 5646.5,4556.5 5646.2,4553.3
  region net 5V: 3881.3,4773.5 3881.3,4766.5 3880,4766 3877.9,4764.8 3875.4,4763 3872.9,4761 3872.9,4779 3875.4,4777 3877.9,4775.2 3880,4774
  region net 5V: 4008.7,4766.5 4008.7,4773.5 4010,4774 4012.1,4775.2 4014.6,4777 4017.1,4779 4017.1,4761 4014.6,4763 4012.1,4764.8 4010,4766
  region net 5V: 4096,4059.1 4100.9,4064 4102.2,4063.4 4104.6,4062.8 4107.6,4062.3 4110.8,4062 4098,4049.2 4097.7,4052.4 4097.2,4055.4 4096.6,4057.8
  region net 5V: 4054,4645.9 4049.1,4641 4047.8,4641.6 4045.4,4642.2 4042.4,4642.7 4039.2,4643 4052,4655.8 4052.3,4652.6 4052.8,4649.6 4053.4,4647.2
  region net 5V: 5564,3416.3 5576,3416.3 5576.3,3414.2 5576.9,3411.8 5577.9,3409.6 5579,3407.9 5561,3407.9 5562.1,3409.6 5563.1,3411.8 5563.7,3414.2
  region net 5V: 5576,3638.7 5564,3638.7 5563.7,3640.8 5563.1,3643.2 5562.1,3645.4 5561,3647.1 5579,3647.1 5577.9,3645.4 5576.9,3643.2 5576.3,3640.8